# Altium PCB PCB2_OBC_ADCS_asistida.PcbDoc (part 2 of 2)
Units mm, origin at the board's own origin, x right, y up, seen from the top; angles counter-clockwise.
Board outline 90.17 x 95.9 mm, 4 copper layers (Top Layer, GND, PWR, Bottom Layer), stack 1.59 mm thick; 52 components, 110 nets, 475 pads, 111 vias.
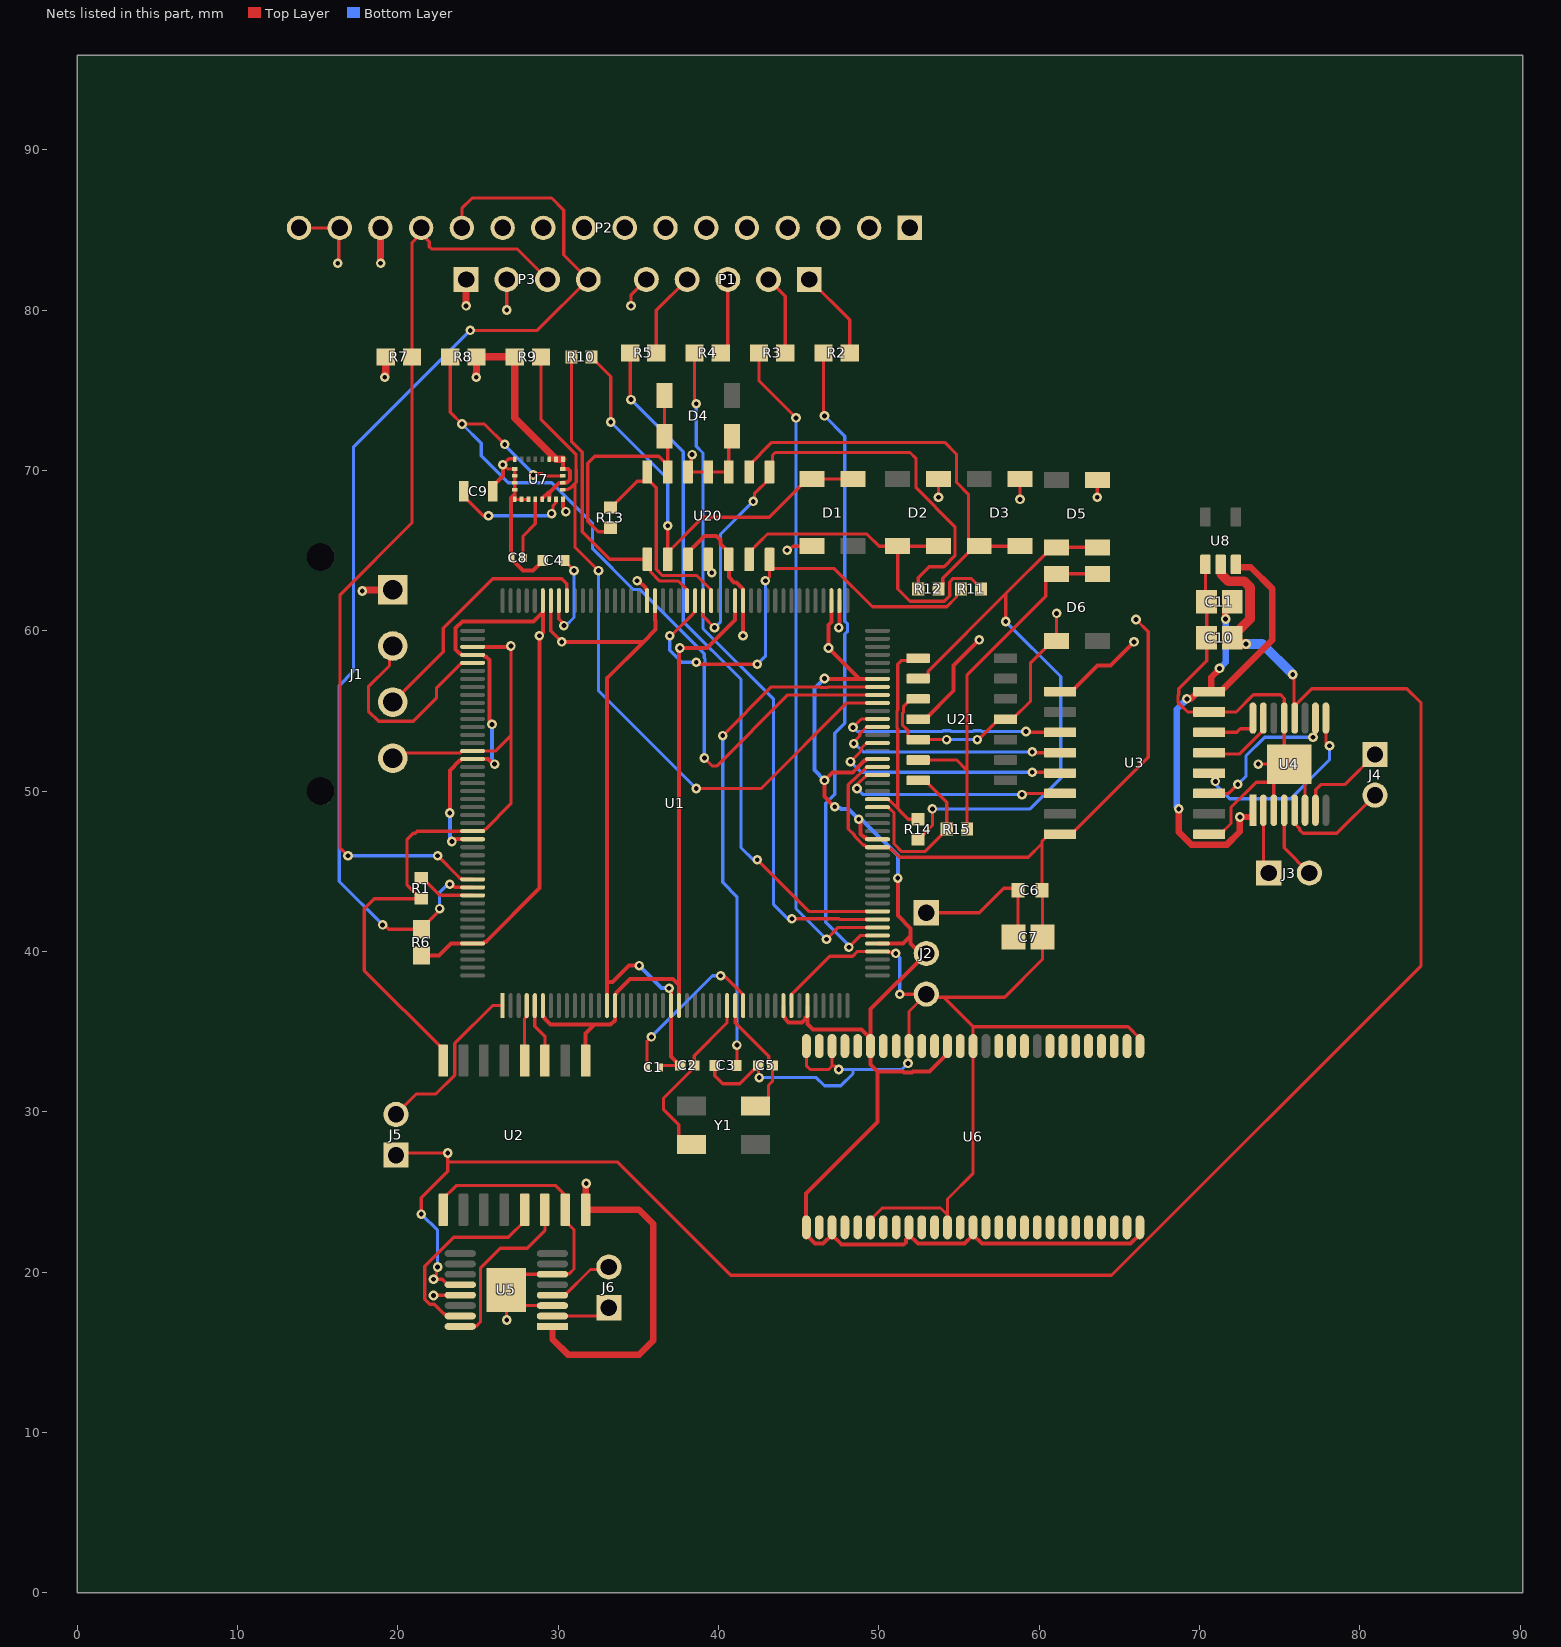
[diagram p4: the nets of this part, all layers, seen from the top]

## Via types
v1: diameter 0.6, hole 0.3, Top Layer to Bottom Layer, 111 vias

## Nets (pads, with @x,y where several pads share a name; then routed paths per layer and width w, separated by ;. In a path a pad name is that pad's centre, name@x,y a point inside that pad or via, vN(x,y) a via of type N, cw(c..) or ccw(c..) an arc to the next point about the centre after c; other vN are vias at no path point)
3V3_DIGITAL: J1.1 J2.2 P2.14 P3.1 R6.2 R7.1 R8.2 R9.1 U1.6 U1.15 U1.23 U1.36 U1.39 U1.49 U1.62 U1.72 U1.82 U1.91 U1.103 U1.114 U1.127 U1.136 U1.149 U1.159 U1.172 U2.1 U3.1 U6.1 U6.3 U6.9 U6.14 U6.27 U6.43 U6.49 U7.1 U7.3 U7.5 U7.6 U7.7 U7.8 U7.22 U7.23 U20.4 U21.4 | length 230.8
  Top Layer w0.25: R6.2@21.463,39.751 22.564,39.751 23.314,40.502 U1.172@24.662,40.502 25.316,40.502 25.415,40.6 25.482,40.6 28.829,43.948 v1(28.829,59.69) 29.039,59.9 U1.127@29.039,61.878 ; v1(23.241,48.641) 23.241,51.301 23.843,51.903 23.91,51.903 24.009,52.002 U1.149@24.662,52.002 ; v1(23.368,46.863) 23.463,46.863 23.601,47.001 U1.159@24.662,47.001 ; U1.149@24.662,52.002 25.628,52.001 25.94,51.689 v1(26.035,51.689) ; v1(25.868,54.165) 25.863,54.165 25.717,54.312 25.717,58.168 25.482,58.403 25.415,58.403 25.316,58.502 U1.136@24.662,58.502 24.009,58.502 23.91,58.6 23.843,58.6 23.608,58.835 23.608,60.168 24.019,60.579 28.46,60.579 28.94,61.059 ; U7.22@29.005,68.199 29.005,68.239 29.399,68.633 29.445,68.633 ; U1.6@29.039,36.625 29.039,35.971 29.138,35.872 29.138,35.805 29.51,35.433 32.258,35.433 ; U7.23@29.435,68.199 29.445,68.209 29.445,68.633 ; U7.8@29.435,70.699 U7.7@29.865,70.699 ; U7.1@30.295,68.199 30.295,67.717 30.48,67.532 v1(30.48,67.437) ; U7.6@30.295,70.699 U7.5@30.295,70.094 30.305,70.084 30.608,70.084 30.734,69.958 30.734,69.904 30.745,69.893 30.745,69.435 30.554,69.244 30.305,69.244 U7.3@30.295,69.234 30.285,69.224 30.036,69.224 29.445,68.633 ; U2.1@31.713,33.191 31.713,34.888 32.258,35.433 ; U1.15@33.539,36.625 33.539,35.698 33.274,35.433 32.258,35.433 ; U1.15@33.539,36.625 33.539,37.279 33.638,37.377 33.638,37.444 34.48,38.286 37.157,38.286 37.494,37.949 ; v1(34.925,63.119) 35.019,63.119 35.44,62.698 35.44,62.631 35.539,62.532 U1.114@35.539,61.878 ; U1.23@37.539,36.625 37.539,58.875 v1(37.592,58.928) 39.294,58.928 41.039,60.673 U1.103@41.039,61.878 ; U20.4@39.37,64.458 39.515,64.313 39.515,63.694 v1(39.582,63.627) ; U1.36@44.039,36.625 44.039,35.971 44.138,35.872 44.138,35.805 44.373,35.57 45.205,35.57 45.44,35.805 45.44,35.872 45.539,35.971 U1.39@45.539,36.625 ; 45.539,35.805 45.539,35.47 45.887,35.123 48.93,35.123 U6.49@49.48,34.573 ; v1(46.609,57.023) 46.63,57.002 48.789,57.002 ; U1.91@47.039,61.878 47.039,60.552 46.863,60.376 v1(46.863,58.928) 48.789,57.002 ; U6.3@47.08,22.798 U6.3@47.08,22.323 ; v1(47.244,49.022) 46.609,49.657 v1(46.609,50.673) 47.11,51.174 48.372,51.174 48.806,51.607 48.806,51.612 49.096,51.903 49.163,51.903 49.262,52.002 U1.72@49.916,52.002 ; v1(48.743,48.252) 48.743,48.157 48.861,48.039 48.861,47.335 49.096,47.1 49.163,47.1 49.262,47.002 U1.62@49.916,47.002 ; U1.49@49.916,40.502 51.509,40.502 51.978,40.971 ; U1.82@49.916,57.002 48.789,57.002 ; v1(51.181,44.577) 51.181,42.237 51.978,41.44 51.978,40.971 ; U6.9@51.88,22.798 U6.9@51.88,22.323 ; U21.4@52.451,54.483 52.876,54.483 54.656,56.263 54.656,57.831 v1(56.261,59.436) ; U6.43@54.28,34.098 54.28,33.623 53.169,32.512 52.121,32.512 52.054,32.445 51.578,32.445 51.511,32.512 49.93,32.512 ; U6.14@55.88,22.798 U6.14@55.88,22.323 ; U3.1@61.305,56.208 62.005,56.208 63.643,57.846 64.45,57.846 v1(65.913,59.309) ; U6.27@66.28,22.798 66.28,22.345 65.708,21.773 56.43,21.773 U6.14@55.88,22.323 ; U6.3@47.08,22.323 47.686,21.717 51.543,21.717 51.689,21.863 51.689,22.051 51.88,22.242 U6.9@51.88,22.323 ; U6.3@47.08,22.323 46.53,21.773 46.03,21.773 45.48,22.323 U6.1@45.48,22.798 45.466,22.812 45.466,24.892 49.93,29.356 49.93,32.512 ; U6.49@49.48,34.573 49.48,36.399 J2.2@52.959,39.878 52.602,39.878 51.978,40.502 51.978,40.971 ; U6.49@49.48,34.573 U6.49@49.48,34.098 49.48,32.962 49.93,32.512 ; U6.9@51.88,22.323 52.43,21.773 55.353,21.773 55.88,22.3 U6.14@55.88,22.323
  Top Layer w0.45: v1(17.78,62.484) 17.851,62.555 J1.1@19.685,62.555 ; P2.14@18.913,85.134 18.913,83.449 18.923,83.439 v1(18.923,82.931) ; v1(19.177,75.819) 19.251,75.893 R7.1@19.251,77.089 ; v1(24.257,80.264) P3.1@24.257,81.915 ; v1(24.892,75.819) 24.892,76.073 24.901,76.082 R8.2@24.901,77.089 R9.1@27.29,77.089 27.29,73.274 U7.7@29.865,70.699 U7.6@30.295,70.699
  Bottom Layer w0.25: v1(23.241,48.641) 23.241,46.99 v1(23.368,46.863) ; v1(25.868,54.165) 25.868,51.856 v1(26.035,51.689) ; v1(46.609,50.673) 45.974,51.308 45.974,56.388 v1(46.609,57.023) ; v1(47.244,49.022) 47.311,48.955 47.565,48.955 47.625,48.895 48.1,48.895 v1(48.743,48.252) 48.838,48.252 48.957,48.133 49.022,48.133 51.181,45.974 v1(51.181,44.577)
3V3_ISO: C11.2 U2.16 U3.16 U4.1 U5.1 U8.3 | length 55.8
  Top Layer w0.4: U5.1@29.644,16.612 29.644,15.822 30.607,14.859 35.052,14.859 35.941,15.748 35.941,22.987 35.037,23.891 U2.16@31.713,23.891 31.713,25.49 v1(31.75,25.527) ; v1(68.707,48.895) 68.707,47.451 69.49,46.668 71.72,46.668 72.517,47.465 v1(72.517,48.387) 73.324,48.387 73.334,48.397 U4.1@73.334,48.81 ; v1(69.215,55.753) 69.45,55.753 69.905,56.208 U3.16@70.605,56.208 71.305,56.208 74.549,59.452 74.549,62.611 73.196,63.964 72.396,63.964 72.271,64.089 U8.3@72.271,64.146 ; U3.16@70.639,56.208 70.739,56.308 70.739,57.096 71.247,57.604 v1(71.247,57.658) ; v1(71.628,60.738) 71.597,60.769 71.597,61.367 C11.2@72.047,61.817
  Bottom Layer w0.4: v1(68.707,48.895) 68.58,49.022 68.58,55.115 69.215,55.75 v1(69.215,55.753) ; v1(71.247,57.658) 71.628,58.039 v1(71.628,60.738)
AOUT1: J3.1 U4.2 | length 4.1
  Top Layer w0.2: U4.2@73.984,48.81 73.984,45.222 J3.1@74.314,44.892
AOUT2: J3.2 U4.4 | length 4.6
  Top Layer w0.2: U4.4@75.284,48.81 75.284,46.462 J3.2@76.854,44.892
BOUT1: J4.1 U4.7 | length 5.9
  Top Layer w0.2: U4.7@77.234,48.81 77.256,48.832 77.256,50.088 77.587,50.419 79.081,50.419 J4.1@80.948,52.286
BOUT2: J4.2 U4.5 | length 7.1
  Top Layer w0.2: U4.5@75.934,48.81 75.934,47.983 76.259,47.658 76.259,47.566 76.454,47.371 78.573,47.371 J4.2@80.948,49.746
CLK: 
CMD: 
COUT1: J6.1 U5.2 | length 3.7
  Top Layer w0.2: U5.2@29.644,17.262 32.647,17.262 J6.1@33.161,17.777
COUT2: J6.2 U5.4 | length 4.2
  Top Layer w0.2: U5.4@29.644,18.562 30.413,18.562 32.017,20.167 33.011,20.167 J6.2@33.161,20.317
D0: P2.1
D1: P2.2
D2: P2.3
D3: P2.4
D4: P2.5
D5: P2.6
D6: P2.7
D7: P2.8
DGND: C1.2 C2.1 C3.2 C4.2 C5.1 C6.2 C7.2 C8.2 C9.2 D1.1 D2.1 D3.1 D4.1 D5.1 D6.1 J1.4 J2.3 P1.5 P2.15 P2.16 P3.2 R1.2 U1.14 U1.22 U1.37 U1.48 U1.61 U1.71 U1.90 U1.102 U1.113 U1.126 U1.135 U1.148 U1.158 U2.8 U3.8 U6.6 U6.12 U6.28 U6.41 U6.46 U6.52 U6.54 U7.13 U7.14 U7.15 U7.16 U7.17 U7.18 U7.19 U7.20 U20.3 U20.5 U20.10 U20.11 U20.12 U21.3 U21.5 U21.11 | length 276.6
  Top Layer w0.2: P2.16@13.833,85.134 P2.15@16.373,85.134 16.314,85.076 16.314,82.989 v1(16.256,82.931) ; J1.4@19.685,52.055 20.001,52.371 23.864,52.371 23.995,52.502 U1.148@24.662,52.502 26.086,52.502 27.051,53.467 ; U2.8@22.823,33.191 22.823,33.891 17.907,38.808 17.907,42.672 18.527,43.292 R1.2@21.463,43.292 21.413,43.292 20.574,44.131 20.574,46.99 20.955,47.371 21.082,47.371 21.213,47.502 U1.158@24.662,47.502 25.33,47.502 25.453,47.625 25.471,47.625 27.051,49.205 27.051,53.467 ; v1(26.797,80.01) P3.2@26.797,81.915 ; v1(27.051,59.055) 27.051,53.467 ; U7.20@28.145,68.199 U7.19@27.715,68.199 U7.18@27.285,68.199 27.285,68.502 U7.17@27.285,68.804 U7.16@27.285,69.234 U7.15@27.285,69.664 U7.14@27.285,70.094 26.845,70.094 26.581,70.358 v1(26.543,70.358) 26.924,70.739 27.051,70.739 ; U1.126@29.539,61.878 29.539,59.996 v1(30.226,59.309) ; v1(34.544,80.264) 34.544,80.958 P1.5@35.501,81.915 ; C1.2@36.341,32.766 36.341,32.793 36.441,32.893 C2.1@37.581,32.893 ; v1(38.354,70.993) 38.277,70.916 38.277,70.085 U20.12@38.1,69.908 U20.11@39.37,69.908 U20.10@40.64,69.908 40.64,71.948 D4.1@40.829,72.137 ; C3.2@39.77,32.919 C3.2@39.77,32.894 39.77,32.239 40.259,31.75 41.323,31.75 42.466,32.893 C5.1@42.486,32.893 42.486,32.19 v1(42.545,32.131) ; v1(44.281,65.024) 44.389,65.024 44.643,65.278 D1.1@45.837,65.278 ; U1.37@44.539,36.625 44.539,37.292 44.663,37.416 44.663,37.434 46.938,39.709 48.361,39.709 48.653,40.002 U1.48@49.916,40.002 ; U6.54@45.48,34.098 45.48,32.879 45.72,32.639 46.863,32.639 47.08,32.856 ; U6.52@47.08,34.098 47.08,32.856 ; v1(47.498,32.639) 47.281,32.856 47.08,32.856 ; U6.6@49.48,22.798 49.48,23.273 50.21,24.003 53.848,24.003 54.28,23.571 54.28,24.562 55.88,26.162 U6.41@55.88,34.098 55.88,35.306 ; U1.71@49.916,51.502 49.248,51.502 49.125,51.378 49.107,51.378 48.444,50.715 48.413,50.715 48.091,50.393 48.091,47.641 48.486,47.246 48.486,47.18 49.041,46.625 49.125,46.625 49.248,46.502 50.583,46.502 50.707,46.378 50.79,46.378 51.29,45.878 59.316,45.878 60.174,46.736 ; U1.48@50.59,39.955 50.977,39.955 v1(51.054,39.878) ; v1(51.308,37.338) J2.3@52.959,37.338 ; v1(51.816,33.02) 51.848,33.052 51.848,34.066 U6.46@51.88,34.098 51.88,36.259 J2.3@52.959,37.338 ; U21.3@52.451,55.753 52.026,55.753 51.531,55.258 51.531,54.912 51.476,54.857 51.476,54.109 51.826,53.759 51.826,53.413 52.026,53.213 U21.5@52.451,53.213 v1(54.229,53.213) ; v1(53.721,68.326) D2.1@53.721,69.478 ; v1(56.134,53.213) 56.206,53.213 57.476,54.483 U21.11@57.901,54.483 58.326,54.483 59.467,55.624 59.467,58.015 60.807,59.356 D6.1@61.082,59.356 61.082,61.082 v1(61.087,61.087) ; v1(58.801,68.199) 58.801,68.453 58.811,68.463 D3.1@58.811,69.478 ; v1(63.627,68.326) 63.627,69.405 D5.1@63.632,69.41 ; v1(66.04,60.706) 66.802,59.944 66.802,52.115 62.005,47.318 U3.8@61.305,47.318 60.605,47.318 60.174,46.887 60.174,46.736 ; U6.28@66.28,34.098 66.28,34.573 65.547,35.306 55.88,35.306 ; 27.051,70.739 27.27,70.739 27.285,70.724 U7.13@27.285,70.699 27.285,70.704 27.27,70.719 27.071,70.719 27.051,70.739 ; J2.3@52.959,37.338 53.155,37.142 54.044,37.142 ; 54.044,37.142 55.88,35.306 ; 54.044,37.142 57.843,37.142 60.21,39.509 C7.2@60.21,40.894 60.21,43.779 C6.2@60.174,43.815 60.174,46.736
  Top Layer w0.25: U1.135@24.662,59.002 26.998,59.002 v1(27.051,59.055) ; C9.2@25.919,68.707 25.919,69.032 26.543,69.656 v1(26.543,70.358) ; C8.2@27.064,64.5 27.81,63.754 28.433,63.754 29.043,64.364 C4.2@29.043,64.389 ; C8.2@27.064,64.55 27.064,68.281 27.285,68.502 ; v1(30.226,59.309) 35.306,59.309 ; U1.14@33.039,36.625 33.039,38.1 ; v1(35.052,39.116) 34.417,39.116 33.401,38.1 33.039,38.1 ; U1.113@36.039,61.878 36.039,60.662 36.068,60.633 36.068,60.071 35.306,59.309 ; v1(36.919,37.711) 36.919,37.617 37.039,37.497 U1.22@37.039,36.625 ; U1.22@37.039,36.625 37.039,33.435 C2.1@37.581,32.893 ; U20.3@38.1,64.458 38.1,64.883 39.13,65.913 39.878,65.913 40.111,65.68 40.111,65.412 40.64,64.883 U20.5@40.64,64.458 40.64,63.358 40.97,63.028 41.11,63.028 41.539,62.599 41.539,61.879 41.539,59.7 v1(41.529,59.69) ; v1(47.498,60.198) 47.539,60.239 U1.90@47.539,61.878 ; 33.039,38.1 33.039,57.042 35.306,59.309
  Bottom Layer w0.2: v1(42.545,32.131) 46.101,32.131 46.609,31.623 47.625,31.623 48.387,32.385 48.387,32.639 ; v1(47.498,32.639) 48.387,32.639 ; v1(51.054,39.878) 51.308,39.624 v1(51.308,37.338) ; v1(51.816,33.02) 51.435,32.639 48.387,32.639 ; v1(54.229,53.213) v1(56.134,53.213)
  Bottom Layer w0.25: v1(35.052,39.116) 36.449,37.719 36.911,37.719 v1(36.919,37.711)
FMC_A0: U6.23
FMC_A1: U6.24
FMC_A2: U6.25
FMC_A3: U6.26
FMC_A4: U6.29
FMC_A5: U6.30
FMC_A6: U6.31
FMC_A7: U6.32
FMC_A8: U6.33
FMC_A9: U6.34
FMC_A10: U6.22
FMC_A11: U6.35
FMC_BA0: U6.20
FMC_BA1: U6.21
FMC_D0: U6.2
FMC_D1: U6.4
FMC_D2: U6.5
FMC_D3: U6.7
FMC_D4: U6.8
FMC_D5: U6.10
FMC_D6: U6.11
FMC_D7: U6.13
FMC_D8: U6.42
FMC_D9: U6.44
FMC_D10: U6.45
FMC_D11: U6.47
FMC_D12: U6.48
FMC_D13: U6.50
FMC_D14: U6.51
FMC_D15: U6.53
FMC_NBL0: U6.15
FMC_NBL1: U6.39
FMC_SDCKE0: U6.37
FMC_SDCLK: U6.38
FMC_SDNCAS: U6.17
FMC_SDNE0: U6.19
FMC_SDNRAS: U6.18
FMC_SDNWE: U6.16
HSYNC: P2.10
I2C_SCL: P2.13 P3.3 R7.2 U1.164 | length 59.5
  Top Layer w0.2: v1(16.891,45.974) 16.383,46.482 16.383,62.23 20.881,66.728 R7.2@20.881,77.089 20.881,84.206 21.453,84.778 P2.13@21.453,85.134 21.453,84.777 21.957,84.273 21.957,83.961 22.098,83.82 27.432,83.82 P3.3@29.337,81.915 ; v1(22.479,45.974) 23.749,44.704 23.749,44.694 23.866,44.577 23.92,44.577 23.995,44.502 U1.164@24.662,44.502
  Bottom Layer w0.2: v1(16.891,45.974) v1(22.479,45.974)
I2C_SDA: P2.12 P3.4 R6.1 U1.165 | length 71
  Top Layer w0.2: v1(19.05,41.656) 19.158,41.656 19.432,41.382 R6.1@21.463,41.382 ; R6.1@21.463,41.418 22.606,42.561 v1(22.606,42.672) ; v1(23.241,44.196) 23.349,44.196 23.544,44.002 U1.165@24.662,44.002 ; P2.12@23.993,85.134 23.993,86.35 24.638,86.995 29.591,86.995 30.353,86.233 30.353,83.439 P3.4@31.877,81.915 28.702,78.74 v1(24.511,78.74)
  Bottom Layer w0.2: v1(19.05,41.656) 16.341,44.365 16.341,56.579 17.23,57.468 17.23,71.459 v1(24.511,78.74) ; v1(22.606,42.672) 22.606,43.688 23.114,44.196 v1(23.241,44.196)
IMU_SCL: R9.2 U1.79 U7.2 | length 45.4
  Top Layer w0.2: R9.2@28.921,77.089 28.921,73.187 31.115,70.993 31.115,70.053 31.12,70.048 31.12,69.28 31.048,69.208 ; U7.2@30.295,68.804 30.31,68.819 30.614,68.819 30.664,68.869 30.709,68.869 31.048,69.208 ; v1(32.512,63.754) 31.048,65.218 31.048,69.208 ; v1(38.608,50.165) 42.672,50.165 48.009,55.502 U1.79@49.916,55.502
  Bottom Layer w0.2: v1(32.512,63.754) 32.512,56.261 v1(38.608,50.165)
IMU_SDA: R8.1 U1.80 U7.4 | length 54.1
  Top Layer w0.2: R8.1@23.27,77.089 23.27,73.631 v1(24.003,72.898) 25.4,72.898 v1(26.67,71.628) ; v1(28.448,69.723) 28.525,69.8 28.993,69.8 29.128,69.664 U7.4@30.295,69.664 ; v1(39.116,52.07) 39.624,51.562 39.878,51.562 44.318,56.002 U1.80@49.916,56.002
  Bottom Layer w0.2: v1(24.003,72.898) 25.197,71.704 25.197,70.926 26.891,69.232 29.59,69.232 32.144,66.678 32.144,65.123 34.697,62.569 35.11,62.569 39.116,58.563 39.116,58.309 39.158,58.267 39.158,57.811 39.116,57.769 v1(39.116,52.07) ; v1(26.67,71.628) 26.67,71.564 28.448,69.787 v1(28.448,69.723)
NetC1_1: C1.1 U1.31 | length 10.5
  Top Layer w0.2: C1.1@35.541,32.766 35.541,34.398 v1(35.814,34.671) ; v1(40.132,38.481) 40.209,38.404 40.445,38.404 41.415,37.434 41.415,37.416 41.539,37.292 U1.31@41.539,36.625
  Bottom Layer w0.2: v1(35.814,34.671) 39.624,38.481 v1(40.132,38.481)
NetC2_2: C2.2 U1.29 Y1.3 | length 11.2
  Top Layer w0.2: Y1.3@38.316,27.965 38.016,27.965 37.516,28.465 37.516,29.193 36.576,30.133 36.576,30.861 38.251,32.536 38.251,32.683 38.461,32.893 C2.2@38.481,32.893 38.481,33.503 40.529,35.551 40.529,36.615 U1.29@40.539,36.625
NetC3_1: C3.1 U1.81 | length 31.9
  Top Layer w0.2: v1(40.259,53.467) 43.294,56.502 46.353,56.502 46.381,56.473 46.837,56.473 46.865,56.502 U1.81@49.916,56.502 ; C3.1@41.12,32.894 41.148,32.922 v1(41.148,34.163)
  Bottom Layer w0.2: v1(40.259,53.467) 40.259,44.314 41.148,43.425 v1(41.148,34.163)
NetC4_1: C4.1 U1.125 | length 6.3
  Top Layer w0.2: U1.125@30.039,61.878 30.039,60.747 30.353,60.433 v1(30.353,60.325) ; C4.1@30.393,64.389 30.393,64.364 30.988,63.769 v1(30.988,63.754)
  Bottom Layer w0.2: v1(30.353,60.325) 30.48,60.325 30.988,60.833 v1(30.988,63.754)
NetC5_2: C5.2 U1.30 Y1.1 | length 7.8
  Top Layer w0.2: U1.30@41.039,36.625 41.049,36.615 41.049,35.547 43.136,33.461 43.136,33.103 43.346,32.893 C5.2@43.366,32.893 43.366,31.899 43.116,31.649 43.116,30.865 42.616,30.365 Y1.1@42.316,30.365
NetC6_1: C6.1 C7.1 J2.1 | length 9.4
  Top Layer w0.2: J2.1@52.959,42.418 56.261,42.418 57.785,43.942 58.547,43.942 C6.1@58.674,43.815 58.674,41.16 C7.1@58.408,40.894
NetC8_1: C8.1 U7.21 | length 4
  Top Layer w0.2: C8.1@27.864,64.55 27.813,64.601 27.813,65.913 28.575,66.675 U7.21@28.575,68.199
NetC9_1: C9.1 U7.24 | length 7.3
  Top Layer w0.2: C9.1@24.119,68.707 24.119,68.382 25.318,67.183 v1(25.654,67.183) ; v1(29.591,67.31) 29.668,67.387 29.668,67.788 29.85,67.97 29.85,68.184 U7.24@29.865,68.199
  Bottom Layer w0.2: v1(25.654,67.183) 29.464,67.183 v1(29.591,67.31)
NetD1_3: D1.3 D1.4 R10.1 U20.2 | length 28.5
  Top Layer w0.2: R10.1@32.076,77.089 32.076,77.062 33.274,75.864 v1(33.274,73.025) ; v1(36.83,66.548) U20.2@36.83,64.458 36.83,64.883 39.027,67.08 43.164,67.08 45.562,69.478 D1.4@45.837,69.478 D1.3@48.387,69.478
  Bottom Layer w0.2: v1(33.274,73.025) 36.83,69.469 v1(36.83,66.548)
NetD2_3: D2.3 D2.4 R11.1 U20.6 | length 22.6
  Top Layer w0.2: U20.6@41.91,64.458 41.91,64.883 42.582,65.555 42.582,65.569 43.053,66.04 49.254,66.04 50.016,65.278 D2.3@51.171,65.278 ; D2.4@53.721,65.278 D2.3@51.171,65.278 ; R11.1@56.379,62.611 56.379,62.638 55.75,63.267 54.643,63.267 54.419,63.044 54.419,62.178 54.09,61.849 51.943,61.849 51.181,62.611 51.181,65.268 D2.3@51.171,65.278
NetD3_3: D3.3 D3.4 R12.1 U20.9 | length 26.9
  Top Layer w0.2: U20.9@41.91,69.908 41.91,70.333 43.332,71.755 54.102,71.755 54.844,71.013 54.844,69.266 55.586,68.524 55.586,65.678 D3.3@55.986,65.278 ; R12.1@53.713,62.611 53.992,62.89 53.992,63.284 D3.3@55.986,65.278 ; D3.4@58.811,65.278 D3.3@56.261,65.278 D3.3@55.986,65.278
NetD4_3: D4.3 D4.4 R13.1 U20.13 | length 15.7
  Top Layer w0.2: R13.1@33.256,66.429 33.004,66.177 32.502,66.177 31.846,66.833 31.846,70.454 32.275,70.883 36.28,70.883 U20.13@36.83,70.333 ; D4.3@36.629,74.687 D4.4@36.629,72.137 36.83,71.936 U20.13@36.83,70.333 ; U20.13@36.83,69.908 U20.13@36.83,70.333
NetD5_3: D5.3 D5.4 R14.1 U21.2 | length 38.8
  Top Layer w0.2: R14.1@52.451,46.998 52.478,46.998 53.34,47.86 v1(53.34,48.895) ; U21.2@52.451,57.023 52.876,57.023 53.076,57.223 53.076,57.479 57.933,62.336 ; v1(57.912,60.579) 57.912,62.315 57.933,62.336 ; D5.4@63.632,65.21 D5.3@61.082,65.21 60.807,65.21 57.933,62.336
  Bottom Layer w0.2: v1(53.34,48.895) 59.436,48.895 61.341,50.8 61.341,57.15 v1(57.912,60.579)
NetD6_3: D6.3 D6.4 R15.1 U21.6 | length 24.3
  Top Layer w0.2: U21.6@52.451,51.943 54.856,51.943 55.491,51.308 ; R15.1@55.491,47.625 55.491,51.308 ; D6.3@63.632,63.556 D6.4@61.082,63.556 60.807,63.556 60.407,63.156 60.407,62.148 55.491,57.232 55.491,51.308
NetJ5_2: J5.2 U1.1 | length 10.6
  Top Layer w0.2: J5.2@19.879,29.838 21.15,31.109 22.365,31.109 23.543,32.288 23.543,34.265 25.903,36.625 U1.1@26.539,36.625
NetR1_1: R1.1 U1.166 | length 3.7
  Top Layer w0.2: R1.1@21.463,44.592 21.513,44.592 22.604,43.502 U1.166@24.662,43.502
NetR2_2: R2.2 U1.50 | length 41
  Top Layer w0.2: R2.2@46.55,77.343 46.55,73.465 v1(46.609,73.406) ; v1(48.133,40.259) 48.876,41.002 U1.50@49.916,41.002
  Bottom Layer w0.2: v1(46.609,73.406) 47.879,72.136 47.879,60.595 48.048,60.426 48.048,59.97 47.879,59.801 47.879,54.245 47.244,53.61 47.244,49.8 46.694,49.25 46.694,41.825 48.133,40.386 v1(48.133,40.259)
NetR3_2: R3.2 U1.51 | length 41.8
  Top Layer w0.2: R3.2@42.53,77.343 42.53,75.58 v1(44.831,73.279) ; v1(46.736,40.767) 47.471,41.502 U1.51@49.916,41.502
  Bottom Layer w0.2: v1(44.831,73.279) 44.831,42.672 v1(46.736,40.767)
NetR4_2: R4.2 U1.52 | length 43.3
  Top Layer w0.2: R4.2@38.51,77.343 38.51,74.266 v1(38.608,74.168) ; v1(44.577,42.037) 47.514,42.037 47.549,42.002 U1.52@49.916,42.002
  Bottom Layer w0.2: v1(38.608,74.168) 38.608,71.517 39.032,71.093 39.032,60.139 43.434,55.737 43.434,42.926 44.323,42.037 v1(44.577,42.037)
NetR5_2: R5.2 U1.53 | length 43.9
  Top Layer w0.2: R5.2@34.491,77.343 34.491,74.475 v1(34.544,74.422) ; v1(42.418,45.72) 45.636,42.502 U1.53@49.916,42.502
  Bottom Layer w0.2: v1(34.544,74.422) 37.804,71.162 37.804,60.567 41.402,56.969 41.402,46.482 42.164,45.72 v1(42.418,45.72)
NetU2_13: U2.13 U5.15 | length 12.8
  Top Layer w0.2: U5.15@23.894,17.262 23.066,17.262 22.93,17.399 22.86,17.399 22.267,17.992 21.997,17.992 21.675,18.314 21.675,18.584 21.675,20.362 23.485,22.172 26.884,22.172 27.903,23.191 U2.13@27.903,23.891
NetU2_14: U2.14 U5.16 | length 11
  Top Layer w0.2: U5.16@23.894,16.612 23.918,16.637 24.892,16.637 25.146,16.891 25.146,20.233 26.397,21.484 28.066,21.484 29.173,22.591 U2.14@29.173,23.891
NetU3_11: U3.11 U4.10 | length 9.9
  Top Layer w0.2: U3.11@70.605,49.858 71.829,49.858 v1(72.39,50.419) ; v1(77.08,53.357) 77.08,53.465 77.192,53.577 77.192,54.518 U4.10@77.234,54.561
  Bottom Layer w0.2: v1(72.39,50.419) 72.898,50.927 72.898,52.197 74.058,53.357 v1(77.08,53.357)
NetU3_12: U3.12 U4.9 | length 12.2
  Top Layer w0.2: U3.12@70.605,51.128 70.793,51.128 70.993,50.928 v1(70.993,50.608) ; U4.9@77.884,54.561 77.884,53.053 v1(78.105,52.832)
  Bottom Layer w0.2: v1(70.993,50.608) 70.993,50.419 71.882,49.53 75.692,49.53 78.105,51.943 v1(78.105,52.832)
NetU3_13: U3.13 U4.15 | length 4.8
  Top Layer w0.2: U3.13@70.605,52.398 70.679,52.324 72.516,52.324 73.984,53.792 U4.15@73.984,54.561
NetU3_14: U3.14 U4.16 | length 3.4
  Top Layer w0.2: U3.14@70.605,53.668 72.327,53.668 72.552,53.893 73.232,53.893 73.334,53.995 U4.16@73.334,54.561
PCLK: P2.9
PGND: C10.2 C11.1 U2.9 U2.15 U3.9 U3.15 U4.3 U4.6 U4.13 U4.17 U5.3 U5.6 U5.13 U5.17 U8.1 | length 60.9
  Top Layer w0.2: v1(22.225,18.542) 22.352,18.542 22.372,18.562 U5.13@23.894,18.562 ; U2.9@22.823,23.891 22.823,24.591 23.632,25.4 29.845,25.4 30.353,24.892 30.363,24.892 30.363,23.972 U2.15@30.443,23.891 30.443,23.191 30.988,22.647 30.988,20.193 30.7,19.905 29.687,19.905 U5.6@29.644,19.862 27.744,19.862 U5.17@26.769,18.887 ; v1(26.797,17.018) 26.769,17.046 U5.17@26.769,18.887 ; U5.3@29.644,17.912 27.744,17.912 U5.17@26.769,18.887 ; U8.1@70.371,64.146 70.371,61.893 C11.1@70.447,61.817 C10.2@70.447,59.563 70.447,58.128 68.707,56.388 68.707,56.023 68.665,55.981 68.665,55.525 68.987,55.203 69.003,55.203 69.268,54.938 U3.15@70.605,54.938 72.293,54.938 73.362,56.007 75.057,56.007 75.284,55.78 U4.13@75.284,54.561 75.284,52.01 U4.17@75.609,51.685 ; U3.9@70.605,47.318 71.305,47.318 71.967,47.98 71.967,48.985 73.538,50.555 74.479,50.555 U4.17@74.634,50.71 ; v1(73.66,51.689) 73.664,51.685 U4.17@75.609,51.685 ; U4.3@74.634,48.81 U4.17@74.634,50.71 ; U4.6@76.584,48.81 76.584,50.71 U4.17@75.609,51.685 ; U4.17@74.634,50.71 U4.17@75.609,51.685
PWM_A1: U1.77 U3.3 | length 14.9
  Top Layer w0.2: v1(48.387,53.975) 48.914,54.502 U1.77@49.916,54.502 ; v1(59.182,53.721) 59.235,53.668 U3.3@61.305,53.668
  Bottom Layer w0.2: v1(48.387,53.975) 48.641,53.721 53.959,53.721 54.001,53.763 54.457,53.763 54.499,53.721 55.864,53.721 55.906,53.763 56.362,53.763 56.404,53.721 v1(59.182,53.721)
PWM_A2: U1.76 U3.4 | length 15.2
  Top Layer w0.2: v1(48.431,52.967) 48.431,53.061 48.809,53.438 48.809,53.579 49.107,53.878 49.125,53.878 49.248,54.002 U1.76@49.916,54.002 ; v1(59.563,52.451) 59.616,52.398 U3.4@61.305,52.398
  Bottom Layer w0.2: v1(48.431,52.967) 48.506,52.967 49.022,52.451 v1(59.563,52.451)
PWM_B1: U1.74 U3.5 | length 15.6
  Top Layer w0.2: v1(48.231,51.845) 48.886,52.501 48.886,52.657 49.107,52.878 49.125,52.878 49.248,53.002 U1.74@49.916,53.002 ; v1(59.563,51.181) 61.252,51.181 U3.5@61.305,51.128
  Bottom Layer w0.2: v1(48.231,51.845) 48.895,51.181 v1(59.563,51.181)
PWM_B2: U1.70 U3.6 | length 14.6
  Top Layer w0.2: v1(48.641,50.165) 48.718,50.242 48.718,50.488 49.107,50.878 49.125,50.878 49.248,51.002 U1.70@49.916,51.002 ; v1(58.928,49.784) 59.002,49.858 U3.6@61.305,49.858
  Bottom Layer w0.2: v1(48.641,50.165) 49.022,49.784 v1(58.928,49.784)
PWM_C1: U1.5 U2.3 | length 3.7
  Top Layer w0.2: U1.5@28.539,36.625 28.539,35.342 29.173,34.707 U2.3@29.173,33.191
PWM_C2: U1.4 U2.4 | length 3.5
  Top Layer w0.2: U2.4@27.903,33.191 27.903,35.822 28.039,35.957 U1.4@28.039,36.625
SPI_MISO: P1.3 R4.1 | length 4.8
  Top Layer w0.2: R4.1@40.141,77.343 40.15,77.343 40.581,77.774 P1.3@40.581,81.915
SPI_MOSI: P1.4 R5.1 | length 5.4
  Top Layer w0.2: R5.1@36.121,77.343 36.121,79.995 P1.4@38.041,81.915
SPI_NSS: P1.1 R2.1 | length 5.6
  Top Layer w0.2: P1.1@45.661,81.915 48.181,79.395 R2.1@48.181,77.343
SPI_SCK: P1.2 R3.1 | length 5
  Top Layer w0.2: P1.2@43.121,81.915 44.161,80.875 R3.1@44.161,77.343
SUN_XN: R11.2 U1.108 U20.7 | length 30.5
  Top Layer w0.2: v1(36.957,59.69) 37.036,59.69 38.415,61.069 38.415,61.087 38.539,61.211 U1.108@38.539,61.878 ; v1(38.608,58.039) 38.735,57.912 v1(42.418,57.912) ; v1(42.926,63.119) 43.18,63.373 U20.7@43.18,64.458 43.18,64.084 43.38,63.884 47.218,63.884 49.603,61.499 54.235,61.499 54.846,62.11 54.846,62.332 R11.2@55.125,62.611
  Bottom Layer w0.2: v1(36.957,59.69) 36.957,58.785 37.703,58.039 v1(38.608,58.039) ; v1(42.418,57.912) 42.926,58.42 v1(42.926,63.119)
SUN_XP: R10.2 U1.109 U20.1 | length 20.3
  Top Layer w0.2: R10.2@30.822,77.089 30.822,71.812 31.496,71.138 31.496,66.167 33.205,64.458 U20.1@35.56,64.458 35.76,64.258 35.76,63.684 36.344,63.101 37.502,63.101 37.915,62.687 37.915,62.669 38.039,62.546 U1.109@38.039,61.878
SUN_YN: R13.2 U1.106 U20.14 | length 14.4
  Top Layer w0.2: R13.2@33.256,67.683 33.283,67.683 34.934,69.334 35.36,69.334 35.56,69.534 U20.14@35.56,69.908 35.56,69.483 36.11,68.933 36.11,63.829 36.489,63.451 38.652,63.451 39.529,62.573 39.529,61.888 U1.106@39.539,61.878
SUN_YP: R12.2 U1.107 U20.8 | length 34
  Top Layer w0.2: U1.107@39.039,61.878 39.039,60.91 v1(39.751,60.198) ; v1(42.164,68.072) 42.241,68.149 42.241,68.544 43.18,69.483 U20.8@43.18,69.908 43.364,70.092 43.364,70.933 43.551,71.12 51.943,71.12 52.324,70.739 52.324,68.918 54.746,66.496 54.746,64.674 54.067,63.996 53.138,63.996 52.459,63.317 R12.2@52.459,62.611
  Bottom Layer w0.2: v1(39.751,60.198) 40.132,60.579 40.132,66.04 v1(42.164,68.072)
SUN_ZN: R15.2 U1.66 U21.7 | length 11.2
  Top Layer w0.2: U1.66@49.916,49.002 50.583,49.002 50.707,48.878 50.725,48.878 50.945,48.657 50.945,46.718 51.435,46.228 52.867,46.228 54.237,47.598 R15.2@54.237,47.625 54.237,49.014 54.229,49.022 54.229,49.32 52.876,50.673 U21.7@52.451,50.673
SUN_ZP: R14.2 U1.67 U21.1 | length 13.5
  Top Layer w0.2: U1.67@49.916,49.502 50.583,49.502 50.707,49.378 50.725,49.378 51.181,48.921 51.181,48.916 ; R14.2@52.451,48.252 51.824,48.252 51.295,48.781 51.295,48.802 51.181,48.916 ; U21.1@52.451,58.293 52.315,58.157 51.426,58.157 51.181,57.912 51.181,55.057 51.126,55.002 51.126,53.964 51.181,53.909 51.181,48.916
SWCLK: J1.2 U1.137 | length 13.3
  Top Layer w0.2: J1.2@19.685,59.055 19.476,58.846 19.476,57.83 18.161,56.515 18.161,54.991 18.796,54.356 20.955,54.356 22.404,55.805 22.404,56.429 23.853,57.878 23.871,57.878 23.995,58.002 U1.137@24.662,58.002
SWDIO: J1.3 U1.124 | length 16.1
  Top Layer w0.2: J1.3@19.685,55.555 22.827,58.697 22.827,60.165 25.908,63.246 30.226,63.246 30.539,62.933 U1.124@30.539,61.878
V_BATT: C10.1 J5.1 U4.12 U5.12 U8.2 | length 125.5
  Top Layer w0.2: J5.1@19.879,27.298 20.013,27.432 v1(23.114,27.432) 23.114,26.865 ; v1(21.463,23.622) 21.463,24.647 23.114,26.298 23.114,26.865 ; v1(22.479,20.32) 22.402,20.243 22.402,19.844 22.225,19.666 v1(22.225,19.558) 22.78,19.558 23.125,19.212 U5.12@23.894,19.212 ; v1(75.819,57.277) 75.892,57.204 75.892,54.603 U4.12@75.934,54.561 75.934,55.329 76.993,56.388 82.931,56.388 83.82,55.499 83.82,52.578 83.82,39.121 64.511,19.812 40.767,19.812 33.714,26.865 23.114,26.865
  Top Layer w0.6: U8.2@71.321,64.146 71.346,64.121 71.346,63.538 71.788,63.096 72.779,63.096 73.147,62.728 73.147,60.738 72.047,59.638 C10.1@72.047,59.563 72.047,59.532 72.397,59.182 v1(72.898,59.182)
  Bottom Layer w0.2: v1(21.463,23.622) 22.479,22.606 v1(22.479,20.32)
  Bottom Layer w0.6: v1(72.898,59.182) 73.914,59.182 v1(75.819,57.277)
VSYNC: P2.11
pads on no net: D1.2 D2.2 D3.2 D4.2 D5.2 D6.2 J1. U1.2 U1.3 U1.7 U1.8 U1.9 U1.10 U1.11 U1.12 U1.13 U1.16 U1.17 U1.18 U1.19 U1.20 U1.21 U1.24 U1.25 U1.26 U1.27 U1.28 U1.32 U1.33 U1.34 U1.35 U1.38 U1.40 U1.41 U1.42 U1.43 U1.44 U1.45 U1.46 U1.47 U1.54 U1.55 U1.56 U1.57 U1.58 U1.59 U1.60 U1.63 U1.64 U1.65 U1.68 U1.69 U1.73 U1.75 U1.78 U1.83 U1.84 U1.85 U1.86 U1.87 U1.88 U1.89 U1.92 U1.93 U1.94 U1.95 U1.96 U1.97 U1.98 U1.99 U1.100 U1.101 U1.104 U1.105 U1.110 U1.111 U1.112 U1.115 U1.116 U1.117 U1.118 U1.119 U1.120 U1.121 U1.122 U1.123 U1.128 U1.129 U1.130 U1.131 U1.132 U1.133 U1.134 U1.138 U1.139 U1.140 U1.141 U1.142 U1.143 U1.144 U1.145 U1.146 U1.147 U1.150 U1.151 U1.152 U1.153 U1.154 U1.155 U1.156 U1.157 U1.160 U1.161 U1.162 U1.163 U1.167 U1.168 U1.169 U1.170 U1.171 U1.173 U1.174 U1.175 U1.176 U2.2 U2.5 U2.6 U2.7 U2.10 U2.11 U2.12 U3.2 U3.7 U3.10 U4.8 U4.11 U4.14 U5.5 U5.7 U5.8 U5.9 U5.10 U5.11 U5.14 U6.36 U6.40 U7.9 U7.10 U7.11 U7.12 U8.4 U8.5 U21.8 U21.9 U21.10 U21.12 U21.13 U21.14 Y1.2 Y1.4

## Polygon pours and split planes (outlines as drawn)
DGND on GND "GND" (solid, pour order 1): 0,88.265 89.789,88.265 89.789,58.293 0.508,58.293 0.381,58.166
PGND on GND "PGND_L02_P002" (solid, pour order 2): 0.635,54.483 1.397,54.483 89.535,54.483 89.535,12.954 88.9,13.589 0.508,13.589
3V3_DIGITAL on PWR "3V3_DIGITAL_L03_P003" (solid, pour order 3): 0,88.392 89.662,88.392 89.789,88.265 89.662,88.138 89.662,58.166 0.381,58.166 0,58.547
3V3_ISO on PWR "3V3_ISO" (solid, pour order 4): 0.508,54.356 89.408,54.356 89.408,13.589 0.635,13.589 0.381,13.843 0.381,54.102

## Silkscreen, mask and mechanical layers (free items; w line width, h text height)
Mechanical 2:
  circle w0.013: c8.149,92.325 r1.6
  circle w0.013: c84.319,92.325 r1.6
  circle w0.013: c84.319,10.435 r1.6
  circle w0.013: c8.149,10.435 r1.6
  lines w0.013: 6.506,0.006 0.006,6.506 0.006,89.396 6.506,95.896 83.676,95.896 90.176,89.396 90.176,6.506 83.676,0.006 ; 7.649,3.435 84.819,3.435